# Altium PCB Main-PCB-v1.0-1.PcbDoc (part 2 of 5)
Units mil, origin at the board's own origin, x right, y up, seen from the top; angles counter-clockwise.
Board outline 8760 x 2778 mil, 2 copper layers (Top Layer, Bottom Layer), stack 57 mil thick; 252 components, 204 nets, 813 pads, 473 vias.
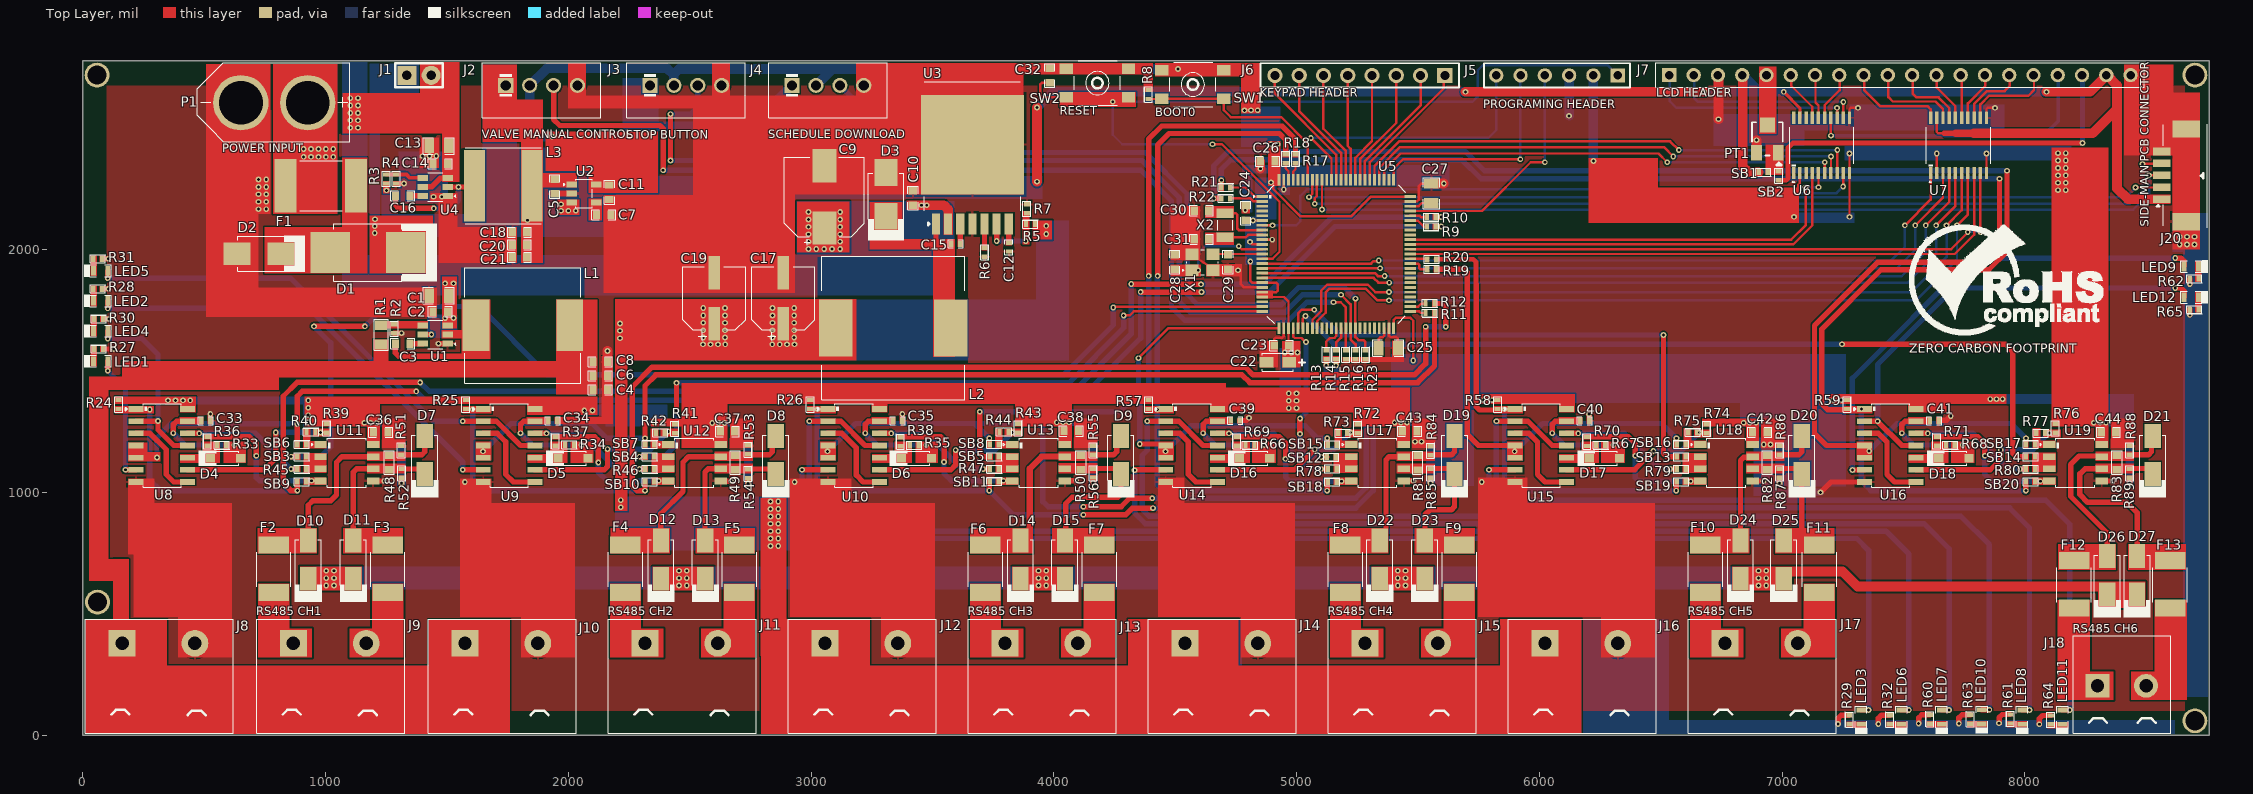
[diagram p0: Top Layer view]

## Part data (continued)
D7 D8 D9 D10 D11 D12 D13 D14 D15 D19 D20 D21 D22 D23 D24 D25 D26 D27: "TVS DIODE 6.5VWM 11.2VC DO214AC", Breakdown Voltage=7.22V, Case/Package=DO-214AC, Clamping Voltage=11.2V, LCSC Part Number=C83330, Leakage Current=1mA, Manufacturer=Littelfuse, Max Breakdown Voltage=7.98V, Max Operating Temperature=150°C, Max Power Dissipation=3.3W, Max Surge Current=35.7A, Min Operating Temperature=-65°C, Operating Supply Voltage=6.5V, Package Quantity=5000, Peak Pulse Power=400W, Power Line Protection=No, Test Current=10mA, Category="TVS Diodes", Clamping Voltage-Max=11.2V, ComponentLink1Description=https://datasheet.ciiva.com/340/littelfuse-tvs-diode-smaj-datasheet-pdf-340656.pdf?src-supplier=Digi-Key, ComponentLink1URL=https://datasheet.ciiva.com/340/littelfuse-tvs-diode-smaj-datasheet-pdf-340656.pdf?src-supplier=Digi-Key, ComponentLink2Description=https://datasheet.ciiva.com/340/littelfuse-tvs-diode-smaj-datasheet-pdf-340657.pdf?src-supplier=Digi-Key, ComponentLink2URL=https://datasheet.ciiva.com/340/littelfuse-tvs-diode-smaj-datasheet-pdf-340657.pdf?src-supplier=Digi-Key, ComponentLink3Description=https://datasheet.ciiva.com/16391/littelfuse-tvs-diode-smaj-16391802.pdf?src-supplier=Future+Electronics, ComponentLink3URL=https://datasheet.ciiva.com/16391/littelfuse-tvs-diode-smaj-16391802.pdf?src-supplier=Future+Electronics, ComponentLink4Description=https://datasheet.ciiva.com/340/littelfuse-tvs-diode-smaj-datasheet-pdf-340655.pdf?src-supplier=Digi-Key, ComponentLink4URL=https://datasheet.ciiva.com/340/littelfuse-tvs-diode-smaj-datasheet-pdf-340655.pdf?src-supplier=Digi-Key, Diode Type=ZENER, Direction=Bidirectional, Height=2.29mm, Item Type=Diode, Lead Free="Lead Free", Length=5.28mm, Manufacturer Part Number=SMAJ6.5CA, Min Breakdown Voltage=7.22V, Mounting Technology="Surface Mount", Number of Bidirectional Channels=1, Number of Channels=1, Number of Elements=1, Packaging="Tape and Reel", Peak Pulse Current=35.7A, Pins=2, Polarity=Bidirectional, Power Dissipation=400W, Pricing 1="5000=0.0893, 10000=0.0814, 25000=0.0761, 50000=0.0683, 125000=0.0656 (USD)", Reach SVHC Compliant=No, Reverse Breakdown Voltage=7.22V, Reverse Standoff Voltage=6.5V, RoHS=Yes, RoHS Compliant=Yes, Series=SMAJ, Stock 1=45000, Supplier 1="Arrow Electronics", Supplier Part Number 1=SMAJ6.5CA, Termination=SMD/SMT, Voltage Rating (DC)=6.5V, Width=2.79mm
F1: "30V 5A 5A 2920 Resettable Fuses ROHS", LCSC Part Number=C495350, Manufacturer="PTTC(Polytronics Tech)", Package=2920, ComponentLink1Description=LCSC, ComponentLink1URL=https://www.lcsc.com/product-detail/Resettable-Fuses_PTTC-Polytronics-Tech-SHV2920P500-30-AA_C495350.html, Item Type=Fuse, Manufacturer Part Number=SHV2920P500-30-AA
F2 F3 F4 F5 F6 F7 F8 F9 F10 F11 F12 F13: "60V 100mA 40A 300mA 1812 Resettable Fuses ROHS", Case Code (Imperial)=1812, Case Code (Metric)=4532, Hold Current=100mA, LCSC Part Number=C12430, Manufacturer=Bourns, Max Current Rating=40A, Max Operating Temperature=85°C, Min Operating Temperature=-40°C, Ratings=AEC-Q200, Trip Current=300mA, Voltage Rating=60V, Category=Fuses, ComponentLink1Description=http://www.farnell.com/datasheets/2264697.pdf?src-supplier=Farnell, ComponentLink1URL=http://www.farnell.com/datasheets/2264697.pdf?src-supplier=Farnell, ComponentLink2Description=http://www.farnell.com/datasheets/2264697.pdf?src-supplier=Newark, ComponentLink2URL=http://www.farnell.com/datasheets/2264697.pdf?src-supplier=Newark, ComponentLink3Description=http://www.farnell.com/datasheets/2264697.pdf?src-supplier=Element14, ComponentLink3URL=http://www.farnell.com/datasheets/2264697.pdf?src-supplier=Element14, ComponentLink4Description=http://www.farnell.com/datasheets/1786007.pdf?src-supplier=Newark, ComponentLink4URL=http://www.farnell.com/datasheets/1786007.pdf?src-supplier=Newark, ComponentLink5Description=https://www.bourns.com/docs/Product-Datasheets/mfmsmf.pdf?src-supplier=Digi-Key, ComponentLink5URL=https://www.bourns.com/docs/Product-Datasheets/mfmsmf.pdf?src-supplier=Digi-Key, Item Type=Fuse, Manufacturer Part Number=MF-MSMF010-2, Mounting Technology="Surface Mount", Packaging="Cut Tape", Pricing 1="3000=0.1392 (USD)", RoHS=Yes, RoHS Compliant=Yes, Series="Multifuse®, MF-MSMF", Stock 1=75000, Supplier 1="Arrow Electronics", Supplier Part Number 1=MF-MSMF010-2, Time to Trip=1.5s
J1: "Wire Connecting Pad", Item Type="THrough Hole Pads", Manufacturer Part Number="2P THrough Hole Pads"
J2 J3 J4: "CONN HEADER VERT 4POS 2.5MM", Color=Natural, Contact Resistance=20mR, Current Rating=3A, Housing Color=White, Insulation Resistance=1GR, LCSC Part Number=C144395, Manufacturer=JST, Max Operating Temperature=85°C, Max Voltage Rating (AC)=250V, Min Operating Temperature=-25°C, Package Quantity=500, Supplier Part Number 1=8134090, Category="FFC / FPC", ComponentLink1Description=https://datasheet.ciiva.com/26894/getdatasheetpartid-455616-26894787.pdf?src-supplier=Verical, ComponentLink1URL=https://datasheet.ciiva.com/26894/getdatasheetpartid-455616-26894787.pdf?src-supplier=Verical, ComponentLink2Description=https://datasheet.ciiva.com/26924/getdatasheetpartid-640571-26924035.pdf?src-supplier=Verical, ComponentLink2URL=https://datasheet.ciiva.com/26924/getdatasheetpartid-640571-26924035.pdf?src-supplier=Verical, ComponentLink3Description=https://datasheet.ciiva.com/16203/b4b-xh-alfsn-16203642.pdf?src-supplier=Future+Electronics, ComponentLink3URL=https://datasheet.ciiva.com/16203/b4b-xh-alfsn-16203642.pdf?src-supplier=Future+Electronics, ComponentLink4Description=https://datasheet.ciiva.com/726/exh-726404.pdf?src-supplier=Digi-Key, ComponentLink4URL=https://datasheet.ciiva.com/726/exh-726404.pdf?src-supplier=Digi-Key, Connector Type="Male Pin", Contact Material=Brass, Contact Plating=Tin,Copper,Lead, Depth=5.75mm, Gender=Male, Housing Material=Polyamide, Item Type="JST Connector", Lead Free="Lead Free", Lead Pitch=2.5mm, Length=12.4mm, Manufacturer Part Number=B4B-XH-A(LF)(SN), Material=Polyamide, Max Current Rating=3A, Max Voltage Rating (DC)=250V, Mount="Through Hole", Number of Contacts=4, Number of Positions=4, Number of Rows=1, Orientation=Straight, Packaging=Bulk, Pitch=2.5mm, Pricing 1="1=0.13000, 300=0.11300, 1000=0.11000, 3000=0.10700, 10000=0.10400 (USD)", REACH SVHC="No SVHC", RoHS=Yes, Supplier 1="Future Electronics", Termination=Press-Fit, Voltage Rating=250V, Voltage Rating (AC)=250V, Wire/Cable Gauge=22AWG
J5: "CONN HEADER 6 POS 2.54", Color=Black, Current Rating=3A, Manufacturer="Wurth Electronics", Max Operating Temperature=125°C, Min Operating Temperature=-40°C, Supplier Part Number 1=20X0957, Voltage Rating=250V, Category="Headers and Wire Housings", ComponentLink1Description=http://www.mouser.com/ds/2/445/6130xx11121-538006.pdf?src-supplier=Mouser, ComponentLink1URL=http://www.mouser.com/ds/2/445/6130xx11121-538006.pdf?src-supplier=Mouser, ComponentLink2Description=http://www.farnell.com/cad/1737268.pdf?src-supplier=Element14, ComponentLink2URL=http://www.farnell.com/cad/1737268.pdf?src-supplier=Element14, ComponentLink3Description=https://katalog.we-online.de/em/datasheet/6130xx11121.pdf?src-supplier=Digi-Key, ComponentLink3URL=https://katalog.we-online.de/em/datasheet/6130xx11121.pdf?src-supplier=Digi-Key, Connector Type="Male Pin", Contact Gender=Male, Contact Material="Copper Alloy,Copper", Contact Mating Length=0.236inch, Contact Plating=Gold, Contact Type="Male Pin", Gender=Male, Housing Material=PBT, Item Type=Header, Lead Free="Lead Free", Manufacturer Part Number=61300611121, Mount="Through Hole", Number of Contacts=6, Number of Positions=6, Number of Rows=1, Packaging=Bulk, Pitch=0.1inch, Pricing 1="1=0.34000, 10=0.28900, 25=0.24000, 50=0.20100, 100=0.18200 (USD)", REACH SVHC=Unknown, RoHS=Yes, RoHS Compliant=Yes, Series=WR-PHD, Stock 1=4996, Supplier 1=Newark, Termination="Through Hole"
J6: "2.54mm Plugin 3A -40℃~+105℃ Straight 1x8P 8.5mm Top 8 Square Holes Plugin,P=2.54mm Female Headers ROHS", LCSC Part Number=C2905417, Manufacturer="Shenzhen Kinghelm Elec", Package=Plugin,P=2.54mm, ComponentLink1Description=LCSC, ComponentLink1URL=https://www.lcsc.com/product-detail/span-style-background-color-ff0-Female-span-Headers_Shenzhen-Kinghelm-Elec-KH-2-54FH-1X8P-H8-5_C2905417.html, Item Type=Header, Manufacturer Part Number=KH-2.54FH-1X8P-H8.5
J7: "2.54mm Plugin Brass Straight 1x20P 20 Plugin,P=2.54mm Female Headers ROHS", LCSC Part Number=C124410, Manufacturer="Ckmtw(Shenzhen Cankemeng)", Manufacturer Part Number=B-2200S20P-A120, Package=Plugin,P=2.54mm, ComponentLink1Description=LCSC, ComponentLink1URL=https://www.lcsc.com/product-detail/span-style-background-color-ff0-Female-span-Headers_Ckmtw-Shenzhen-Cankemeng-B-2200S20P-A120_C124410.html, Item Type=Header
J8 J9 J10 J11 J12 J13 J14 J15 J16 J17: "-40℃~+105℃ 20A 300V Green Corner pin Double - Walled(Double) 14~22 Straight pin 2 1 7.62mm Plugin,P=7.62mm Barrier Terminal Blocks ROHS", LCSC Part Number=C394551, Manufacturer=JILN, Package=Plugin,P=7.62mm, ComponentLink1Description=LCSC, ComponentLink1URL=https://www.lcsc.com/product-detail/Barrier-Terminal-Blocks_JILN-JL762B-76202GA1_C394551.html, Item Type="Terminal Block", Manufacturer Part Number=JL762B-76202GA1
J18: library part "Terminal Block 2POS", "2.5 18A Green Straight pin 5.08mm 1 14~30 2 Straight,P=5.08mm", LCSC Part Number=C8465, Manufacturer="Ningbo Kangnex Elec", ComponentLink1Description=LCSC, ComponentLink1URL=https://www.lcsc.com/product-detail/Screw-span-style-background-color-ff0-terminal-span_Ningbo-Kangnex-Elec-WJ500V-5-08-2P_C8465.html, Manufacturer Part Number=WJ500V-5.08-2P
J20: "1x5P 1 1.25mm Male pin 5 -25℃~+85℃ Surface Mount SMD,P=1.25mm Wire To Board / Wire To Wire Connector ROHS", LCSC Part Number=C2905012, Manufacturer=DEALON, Package=SMD,P=1.25mm, ComponentLink1Description=LCSC, ComponentLink1URL=https://www.lcsc.com/product-detail/Wire-To-Board-Wire-To-Wire-Connector_DEALON-1-25-5PWB_C2905012.html, Item Type="JST Right Angle", Manufacturer Part Number=1.25-5PWB
L1: library part YPRH1204-220M, "2.9A 22uH ±20% 66mΩ SMD,12x12x5mm Power Inductors ROHS", LCSC Part Number=C338845, Manufacturer=YJYCOIN, Package=SMD,12x12x5mm, ComponentLink1Description=LCSC, ComponentLink1URL=https://www.lcsc.com/product-detail/Power-Inductors_YJYCOIN-YPRH1204-220M_C338845.html, Item Type=Inductor, Manufacturer Part Number=YPRH1204-220M
L2: library part YPRH1508-330M, "6A 33uH ±20% SMD,15x15x8mm Power Inductors ROHS", LCSC Part Number=C970542, Manufacturer=YJYCOIN, Package=SMD,15x15x8mm, ComponentLink1Description=LCSC, ComponentLink1URL=https://www.lcsc.com/product-detail/Power-Inductors_YJYCOIN-YPRH1508-330M_C970542.html, Item Type=Inductor, Manufacturer Part Number=YPRH1508-330M
L3: library part SWPA8040S100MT, "Fixed Ind 1020%UH 0.029 Ohm 4100M", LCSC Part Number=C37429, Manufacturer=Sunlord, Supplier Part Number 1=3442-SWPA8040S100MTCT-ND, Category="Fixed Inductors", ComponentLink1Description=LCSC, ComponentLink1URL=https://www.lcsc.com/product-detail/Power-Inductors_Sunlord-SWPA8040S100MT_C37429.html, Item Type=Inductor, Manufacturer Part Number=SWPA8040S100MT, Pricing 1="1=1.24, 10=1.149, 25=1.0604, 50=0.8838, 100=0.8307, 250=0.74236, 500=0.6363 (USD)", RoHS=Yes, RoHS Compliant=Yes, Stock 1=2032, Supplier 1=Digi-Key
LED1 LED2 LED3 LED4 LED5 LED6 LED7 LED8 LED9 LED10 LED11 LED12: library part NCD0603G2, "Emerald 0603 Light Emitting Diodes (LED) ROHS", LCSC Part Number=C87326, Manufacturer="Foshan NationStar Optoelectronics", Package=0603, ComponentLink1Description=LCSC, ComponentLink1URL=https://www.lcsc.com/product-detail/Light-Emitting-Diodes-LED_Foshan-NationStar-Optoelectronics-NCD0603G2_C87326.html, Item Type=LED, Manufacturer Part Number=NCD0603G2
P1: "XT60 CONNECTORS MALE/FEMALE PAIR", Manufacturer=SparkFun, Supplier Part Number 1=1568-1816-ND, ComponentLink1Description=https://cdn.sparkfun.com/datasheets/Prototyping/xt60.pdf?src-supplier=Digi-Key, ComponentLink1URL=https://cdn.sparkfun.com/datasheets/Prototyping/xt60.pdf?src-supplier=Digi-Key, Manufacturer Part Number=PRT-10474, Pricing 1="1=1.50000 (USD)", RoHS=No, Stock 1=3234, Supplier 1=Digi-Key
PT1: library part 3313J-1-103E, "TRIMMER 10KOHM 0.125W J LEAD TOP", Color=Natural, Insulation Resistance=100MR, LCSC Part Number=C124616, Manufacturer=Bourns, Max Operating Temperature=125°C, Max Power Dissipation=125mW, Min Operating Temperature=-55°C, Package Quantity=1000, Resistance Tolerance=20%, Resistor Type=Cermet, Supplier Part Number 1=3313J-103ECT-ND, Temperature Coefficient=100ppm/°C, Voltage Rating (DC)=500V, Category="Variable Resistors and Potentiometers", ComponentLink1Description=https://datasheet.ciiva.com/6197/1719390-6197392.pdf?src-supplier=Farnell, ComponentLink1URL=https://datasheet.ciiva.com/6197/1719390-6197392.pdf?src-supplier=Farnell, ComponentLink2Description=https://datasheet.ciiva.com/11831/0900766b80dbb89c-11831555.pdf?src-supplier=Rs, ComponentLink2URL=https://datasheet.ciiva.com/11831/0900766b80dbb89c-11831555.pdf?src-supplier=Rs, ComponentLink3Description=https://datasheet.ciiva.com/43573/1157501-43573718.pdf?src-supplier=Jameco, ComponentLink3URL=https://datasheet.ciiva.com/43573/1157501-43573718.pdf?src-supplier=Jameco, ComponentLink4Description=https://datasheet.ciiva.com/7953/1864507-7953225.pdf?src-supplier=Element14, ComponentLink4URL=https://datasheet.ciiva.com/7953/1864507-7953225.pdf?src-supplier=Element14, ComponentLink5Description=https://datasheet.ciiva.com/28659/1770668-28659191.pdf?src-supplier=Element14, ComponentLink5URL=https://datasheet.ciiva.com/28659/1770668-28659191.pdf?src-supplier=Element14, ComponentLink6Description=https://datasheet.ciiva.com/2156/3313-2156355.pdf?src-supplier=Digi-Key, ComponentLink6URL=https://datasheet.ciiva.com/2156/3313-2156355.pdf?src-supplier=Digi-Key, ComponentLink7Description=https://datasheet.ciiva.com/2156/3313-2156356.pdf?src-supplier=Digi-Key, ComponentLink7URL=https://datasheet.ciiva.com/2156/3313-2156356.pdf?src-supplier=Digi-Key, ComponentLink8Description=https://datasheet.ciiva.com/2156/3313-2156354.pdf?src-supplier=Digi-Key, ComponentLink8URL=https://datasheet.ciiva.com/2156/3313-2156354.pdf?src-supplier=Digi-Key, ComponentLink9Description=https://datasheet.ciiva.com/16715/70153423-16715693.pdf?src-supplier=Allied+Electronics, ComponentLink9URL=https://datasheet.ciiva.com/16715/70153423-16715693.pdf?src-supplier=Allied+Electronics, Depth=3.5mm, Height=2.2mm, Item Type=Potentiometer, Lead Free="Lead Free", Length=3.2mm, Manufacturer Part Number=3313J-1-103E, Military Standard=Not, Mounting Technology="Surface Mount", Number of Turns=1, Packaging="Tape and Reel", Power Rating=125mW, Pricing 1="1=1.83, 10=1.611, 25=1.4444, 50=1.3888, 100=1.3332, 250=1.27764, 500=1.05544 (USD)", Radiation Hardening=No, Reach SVHC Compliant=No, RoHS=Yes, RoHS Compliant=Yes, Series="Trimpot® 3313 - Sealed", Stock 1=15653, Supplier 1=Digi-Key, Taper=Linear, Technology=CERMET, Termination=J-Hook, Tolerance=20%, Type=Potentiometer, Weight=283mg, Width=3.2mm
R1: library part RT0805BRD07422KL, "RES SMD 422K OHM 0.1% 1/8W 0805", Case Code (Imperial)=0805, Case Code (Metric)=2012, LCSC Part Number=C865483, Manufacturer=Yageo, Max Operating Temperature=155°C, Max Power Dissipation=125mW, Min Operating Temperature=-55°C, Supplier Part Number 1=YAG4899CT-ND, Temperature Coefficient=25ppm/°C, Tolerance=0.1%, Voltage Rating=150V, Case/Package=0805, Category="Chip SMD Resistors", ComponentLink1Description=https://datasheet.ciiva.com/12704/pyu-rt-1-to-0-05-rohs-l-4-12704463.pdf?src-supplier=Mouser, ComponentLink1URL=https://datasheet.ciiva.com/12704/pyu-rt-1-to-0-05-rohs-l-4-12704463.pdf?src-supplier=Mouser, Height=500um, Item Type=Resistor, Lead Free="Lead Free", Length=2mm, Manufacturer Part Number=RT0805BRD07422KL, Number of Terminations=2, Packaging="Tape and Reel", Power Rating=125mW, Pricing 1="1=0.38, 10=0.272, 100=0.1087, 500=0.07404, 1000=0.05357, 2500=0.04963 (USD)", RoHS=Yes, RoHS Compliant=Yes, Series=RT, Stock 1=2917, Supplier 1=Digi-Key, Termination=SMD/SMT, Voltage Rating (DC)=150V, Width=1.25mm
R2 R4: library part RT0402BRD0722K1L, "RES SMD 22.1KOHM 0.1% 1/16W 0402", Case Code (Imperial)=0402, Case Code (Metric)=1005, LCSC Part Number=C852648, Manufacturer=Yageo, Max Operating Temperature=155°C, Max Power Dissipation=63mW, Min Operating Temperature=-55°C, Package Quantity=10000, Power Rating=62.5mW, Temperature Coefficient=25ppm/°C, Tolerance=0.1%, Voltage Rating=50V, Case/Package=0402, Category="Chip SMD Resistors", ComponentLink1Description=https://datasheet.ciiva.com/2582/pyu-rt-1-to-0-05-rohs-l-5-2582235.pdf?src-supplier=Digi-Key, ComponentLink1URL=https://datasheet.ciiva.com/2582/pyu-rt-1-to-0-05-rohs-l-5-2582235.pdf?src-supplier=Digi-Key, ComponentLink2Description=https://datasheet.ciiva.com/12797/pyu-rt-1-to-0-05-rohs-l-4-12797086.pdf?src-supplier=Mouser, ComponentLink2URL=https://datasheet.ciiva.com/12797/pyu-rt-1-to-0-05-rohs-l-4-12797086.pdf?src-supplier=Mouser, Height=0.014inch, Item Type=Resistor, Lead Free="Lead Free", Length=0.039inch, Manufacturer Part Number=RT0402BRD0722K1L, Number of Terminations=2, Packaging="Tape and Reel", Pricing 1="10000=0.0417, 20000=0.0733, 30000=0.041, 40000=0.0719, 50000=0.0402, 100000=0.0393 (USD)", RoHS=Yes, RoHS Compliant=Yes, Series=RT, Stock 1=40000, Supplier 1="Arrow Electronics", Supplier Part Number 1=RT0402BRD0722K1L, Termination=SMD/SMT, Voltage Rating (DC)=50V, Weight=2.3E-05oz, Width=0.5mm
R3: library part RT0402BRD07162KL, "RES SMD 162K OHM 0.1% 1/16W 0402", Case/Package=0402, LCSC Part Number=C852551, Manufacturer=Yageo, Max Operating Temperature=155°C, Max Power Dissipation=63mW, Min Operating Temperature=-55°C, Supplier Part Number 1=3159372, Temperature Coefficient=25ppm/°C, Tolerance=0.1%, Category="Chip SMD Resistors", ComponentLink1Description=http://www.yageo.com/documents/recent/PYu-RT_1-to-0.01_RoHS_L_8.pdf?src-supplier=Digi-Key, ComponentLink1URL=http://www.yageo.com/documents/recent/PYu-RT_1-to-0.01_RoHS_L_8.pdf?src-supplier=Digi-Key, Features="Moisture Resistant", Height=0.014inch, Item Type=Resistor, Length=0.039inch, Manufacturer Part Number=RT0402BRD07162KL, Number of Terminations=2, Packaging="Tape and Reel", Pricing 1="10000=0.0218, 20000=0.0213, 30000=0.021, 50000=0.0206, 100000=0.0199 (USD)", RoHS=Yes, RoHS Compliant=Yes, Series=RT, Stock 1=20000, Supplier 1="Future Electronics", Width=0.02inch
R5: library part RT0402BRD0718K7L, "RES SMD 18.7KOHM 0.1% 1/16W 0402", Case Code (Imperial)=0402, Case Code (Metric)=1005, LCSC Part Number=C723581, Manufacturer=Yageo, Max Operating Temperature=155°C, Max Power Dissipation=63mW, Min Operating Temperature=-55°C, Package Quantity=10000, Power Rating=62.5mW, Supplier Part Number 1=YAG1366CT-ND, Temperature Coefficient=25ppm/°C, Tolerance=0.1%, Voltage Rating=50V, Case/Package=0402, Category="Chip SMD Resistors", ComponentLink1Description=https://datasheet.ciiva.com/2582/pyu-rt-1-to-0-05-rohs-l-4-2582177.pdf?src-supplier=Digi-Key, ComponentLink1URL=https://datasheet.ciiva.com/2582/pyu-rt-1-to-0-05-rohs-l-4-2582177.pdf?src-supplier=Digi-Key, ComponentLink2Description=https://datasheet.ciiva.com/12725/pyu-rt-1-to-0-05-rohs-l-4-12725319.pdf?src-supplier=Mouser, ComponentLink2URL=https://datasheet.ciiva.com/12725/pyu-rt-1-to-0-05-rohs-l-4-12725319.pdf?src-supplier=Mouser, ComponentLink3Description=https://datasheet.ciiva.com/46635/pyu-rt-1-to-0-05-rohs-l-5-46635183.pdf?src-supplier=Digi-Key, ComponentLink3URL=https://datasheet.ciiva.com/46635/pyu-rt-1-to-0-05-rohs-l-5-46635183.pdf?src-supplier=Digi-Key, Height=0.014inch, Item Type=Resistor, Lead Free="Lead Free", Length=0.039inch, Manufacturer Part Number=RT0402BRD0718K7L, Number of Terminations=2, Packaging="Tape and Reel", Pricing 1="1=0.4, 10=0.336, 100=0.1313, 500=0.07938, 1000=0.05496, 2500=0.05038, 5000=0.0458 (USD)", RoHS=Yes, RoHS Compliant=Yes, Series=RT, Stock 1=10714, Supplier 1=Digi-Key, Termination=SMD/SMT, Voltage Rating (DC)=50V, Width=0.02inch
R6: library part RT0402BRD076K98L, "RES SMD 6.98KOHM 0.1% 1/16W 0402", Case Code (Imperial)=0402, Case Code (Metric)=1005, LCSC Part Number=C852901, Manufacturer=Yageo, Max Operating Temperature=155°C, Max Power Dissipation=63mW, Min Operating Temperature=-55°C, Package Quantity=10000, Power Rating=62.5mW, Supplier Part Number 1=2098961, Temperature Coefficient=25ppm/°C, Tolerance=0.1%, Voltage Rating=50V, Case/Package=0402, Category="Chip SMD Resistors", ComponentLink1Description=https://datasheet.ciiva.com/2582/pyu-rt-1-to-0-05-rohs-l-4-2582483.pdf?src-supplier=Digi-Key, ComponentLink1URL=https://datasheet.ciiva.com/2582/pyu-rt-1-to-0-05-rohs-l-4-2582483.pdf?src-supplier=Digi-Key, ComponentLink2Description=https://datasheet.ciiva.com/46635/pyu-rt-1-to-0-05-rohs-l-5-46635214.pdf?src-supplier=Digi-Key, ComponentLink2URL=https://datasheet.ciiva.com/46635/pyu-rt-1-to-0-05-rohs-l-5-46635214.pdf?src-supplier=Digi-Key, Height=0.014inch, Item Type=Resistor, Lead Free="Lead Free", Length=0.039inch, Manufacturer Part Number=RT0402BRD076K98L, Number of Terminations=2, Packaging="Tape and Reel", Pricing 1="1=0.173, 20=0.129, 150=0.0997, 1000=0.0719, 5000=0.0482 (USD)", RoHS=Yes, RoHS Compliant=Yes, Series=RT, Stock 1=9500, Supplier 1="Future Electronics", Termination=SMD/SMT, Voltage Rating (DC)=50V, Weight=2.3E-05oz, Width=0.5mm
R7: library part RC0402FR-071KL, "RES 1K OHM 1% 1/16W 0402", Case Code (Imperial)=0402, Case Code (Metric)=1005, LCSC Part Number=C106235, Manufacturer=Yageo, Max Operating Temperature=155°C, Max Power Dissipation=63mW, Min Operating Temperature=-55°C, Power Rating=62.5mW, Resistance=1kR, Resistance Tolerance=1%, Resistor Type="Thick Film", Temperature Coefficient=100ppm/°C, Voltage Rating=50V, Case/Package=0402, Category="Chip SMD Resistors", ComponentLink1Description=https://datasheet.ciiva.com/11819/0900766b80c66297-11819477.pdf?src-supplier=RSComponents, ComponentLink1URL=https://datasheet.ciiva.com/11819/0900766b80c66297-11819477.pdf?src-supplier=RSComponents, ComponentLink2Description=https://datasheet.ciiva.com/7983/1018594-7983502.pdf?src-supplier=Element14, ComponentLink2URL=https://datasheet.ciiva.com/7983/1018594-7983502.pdf?src-supplier=Element14, ComponentLink3Description=https://datasheet.ciiva.com/22747/1018594-22747513.pdf?src-supplier=Element14, ComponentLink3URL=https://datasheet.ciiva.com/22747/1018594-22747513.pdf?src-supplier=Element14, ComponentLink4Description=https://datasheet.ciiva.com/12666/pyu-rc0402-51-rohs-l-6-r-12666741.pdf?src-supplier=Mouser, ComponentLink4URL=https://datasheet.ciiva.com/12666/pyu-rc0402-51-rohs-l-6-r-12666741.pdf?src-supplier=Mouser, ComponentLink5Description=https://datasheet.ciiva.com/7849/1018594-7849869.pdf?src-supplier=Element14, ComponentLink5URL=https://datasheet.ciiva.com/7849/1018594-7849869.pdf?src-supplier=Element14, ComponentLink6Description=https://datasheet.ciiva.com/7849/1018594-7849871.pdf?src-supplier=Element14, ComponentLink6URL=https://datasheet.ciiva.com/7849/1018594-7849871.pdf?src-supplier=Element14, ComponentLink7Description=https://datasheet.ciiva.com/17063/pyu-rc0402-51-rohs-l-6-r-17063193.pdf?src-supplier=Future+Electronics, ComponentLink7URL=https://datasheet.ciiva.com/17063/pyu-rc0402-51-rohs-l-6-r-17063193.pdf?src-supplier=Future+Electronics, Construction=Rectangular, Depth=0.5mm, Features="Moisture Resistant", Height=0.32mm, Item Type=Resistor, Lead Free="Lead Free", Length=1mm, Manufacturer Part Number=RC0402FR-071KL, Military Standard=Not, Number of Pins=2, Number of Terminations=2, Packaging="Tape and Reel", Pricing 1="10000=0.00085, 20000=0.00087, 40000=0.00084, 60000=0.00083, 80000=0.00079, 100000=0.00078, 1000000=0.00076 (USD)", Reach SVHC Compliant=Yes, RoHS=Yes, RoHS Compliant=Yes, Series=RC, Size Code=0402, Stock 1=13030000, Supplier 1=Avnet, Supplier Part Number 1=RC0402FR-071KL, Technology="THICK FILM", Termination=SMD/SMT, Tolerance=1%, Voltage Rating (DC)=50V, Width=0.5mm
R8 R15 R16 R23: library part RC0402FR-0710KL, "RES 10K OHM 1% 1/16W 0402", Case Code (Imperial)=0402, Case Code (Metric)=1005, LCSC Part Number=C60490, Manufacturer=Yageo, Max Operating Temperature=155°C, Max Power Dissipation=63mW, Min Operating Temperature=-55°C, Power Rating=62.5mW, Resistance=10kR, Resistance Tolerance=1%, Resistor Type="Thick Film", Supplier Part Number 1=603-RC0402FR-0710KL, Temperature Coefficient=100ppm/°C, Voltage Rating=50V, Case/Package=0402, Category="Chip SMD Resistors", ComponentLink1Description=https://datasheet.ciiva.com/7660/38568-7660787.pdf?src-supplier=Element14, ComponentLink1URL=https://datasheet.ciiva.com/7660/38568-7660787.pdf?src-supplier=Element14, ComponentLink2Description=https://datasheet.ciiva.com/7849/1686128-7849814.pdf?src-supplier=Element14, ComponentLink2URL=https://datasheet.ciiva.com/7849/1686128-7849814.pdf?src-supplier=Element14, ComponentLink3Description=https://datasheet.ciiva.com/7983/1018594-7983486.pdf?src-supplier=Element14, ComponentLink3URL=https://datasheet.ciiva.com/7983/1018594-7983486.pdf?src-supplier=Element14, ComponentLink4Description=https://datasheet.ciiva.com/22747/1018594-22747512.pdf?src-supplier=Element14, ComponentLink4URL=https://datasheet.ciiva.com/22747/1018594-22747512.pdf?src-supplier=Element14, ComponentLink5Description=https://datasheet.ciiva.com/12667/pyu-rc0402-51-rohs-l-6-r-12667067.pdf?src-supplier=Mouser, ComponentLink5URL=https://datasheet.ciiva.com/12667/pyu-rc0402-51-rohs-l-6-r-12667067.pdf?src-supplier=Mouser, ComponentLink6Description=https://datasheet.ciiva.com/7849/1784430-7849813.pdf?src-supplier=Element14, ComponentLink6URL=https://datasheet.ciiva.com/7849/1784430-7849813.pdf?src-supplier=Element14, ComponentLink7Description=https://datasheet.ciiva.com/7849/1784430-7849815.pdf?src-supplier=Element14, ComponentLink7URL=https://datasheet.ciiva.com/7849/1784430-7849815.pdf?src-supplier=Element14, Construction=Rectangular, Depth=0.5mm, Features="Moisture Resistant", Height=0.32mm, Lead Free="Lead Free", Lead Pitch=0.2mm, Length=1mm, Manufacturer Part Number=RC0402FR-0710KL, Military Standard=Not, Number of Pins=2, Number of Terminations=2, Packaging="Tape and Reel", Pricing 1="1=0.10000, 10=0.01400, 50=0.01400, 100=0.00500, 1000=0.00300, 10000=0.00200 (USD)", REACH SVHC="No SVHC", RoHS=Yes, RoHS Compliant=Yes, Series=RC, Stock 1=18648329, Supplier 1=Mouser, Termination=SMD/SMT, Tolerance=1%, Voltage Rating (DC)=50V, Width=0.5mm, Working Voltage=50V
R9 R10 R11 R12 R13 R14 R17 R18 R19 R20 R21 R22 R36 R37 R38 R40 R42 R44 R45 R46 R47 R69 R70 R71 R73 R75 R77 R78 R79 R80: library part RC0402FR-070RL, "RES 0 OHM JUMPER 1/16W 0402", Case Code (Imperial)=0402, Case Code (Metric)=1005, LCSC Part Number=C106231, Manufacturer=Yageo, Max Operating Temperature=155°C, Max Power Dissipation=63mW, Min Operating Temperature=-55°C, Power Rating=62.5mW, Resistor Type="Thick Film", Supplier Part Number 1=603-RC0402FR-070RL, Temperature Coefficient=200ppm/°C, Tolerance=1%, Voltage Rating=50V, Case/Package=0402, Category="Chip SMD Resistors", ComponentLink1Description=https://datasheet.ciiva.com/8896/pyu-rc0402-51-rohs-l-6-8896149.pdf?src-supplier=Avnet, ComponentLink1URL=https://datasheet.ciiva.com/8896/pyu-rc0402-51-rohs-l-6-8896149.pdf?src-supplier=Avnet, ComponentLink2Description=https://datasheet.ciiva.com/16790/pyu-rc0402-51-rohs-l-6-r-16790444.pdf?src-supplier=Future+Electronics, ComponentLink2URL=https://datasheet.ciiva.com/16790/pyu-rc0402-51-rohs-l-6-r-16790444.pdf?src-supplier=Future+Electronics, Contact Plating=Tin,Matte, Features="Moisture Resistant", Height=0.35mm, Lead Free="Lead Free", Length=1mm, Manufacturer Part Number=RC0402FR-070RL, Mount="Surface Mount", Number of Terminations=2, Packaging="Tape and Reel", Pricing 1="1=0.10000, 10=0.01400, 50=0.01400, 100=0.00600, 1000=0.00300, 5000=0.00200, 10000=0.00100 (USD)", Radiation Hardening=No, Resistance=0R, RoHS=Yes, RoHS Compliant=Yes, Series=RC, Size Code=0402, Stock 1=8556842, Supplier 1=Mouser, Termination=SMD/SMT, Width=0.5mm